# Altium PCB POD-Design-v1.1.PcbDoc (part 3 of 7)
Units mil, origin at the board's own origin, x right, y up, seen from the top; angles counter-clockwise.
Board outline 5511.81 x 3937.01 mil, 4 copper layers (Top Layer, Layer 1, Layer 2, Bottom Layer), stack 61.653 mil thick; 308 components, 227 nets, 905 pads, 367 vias.
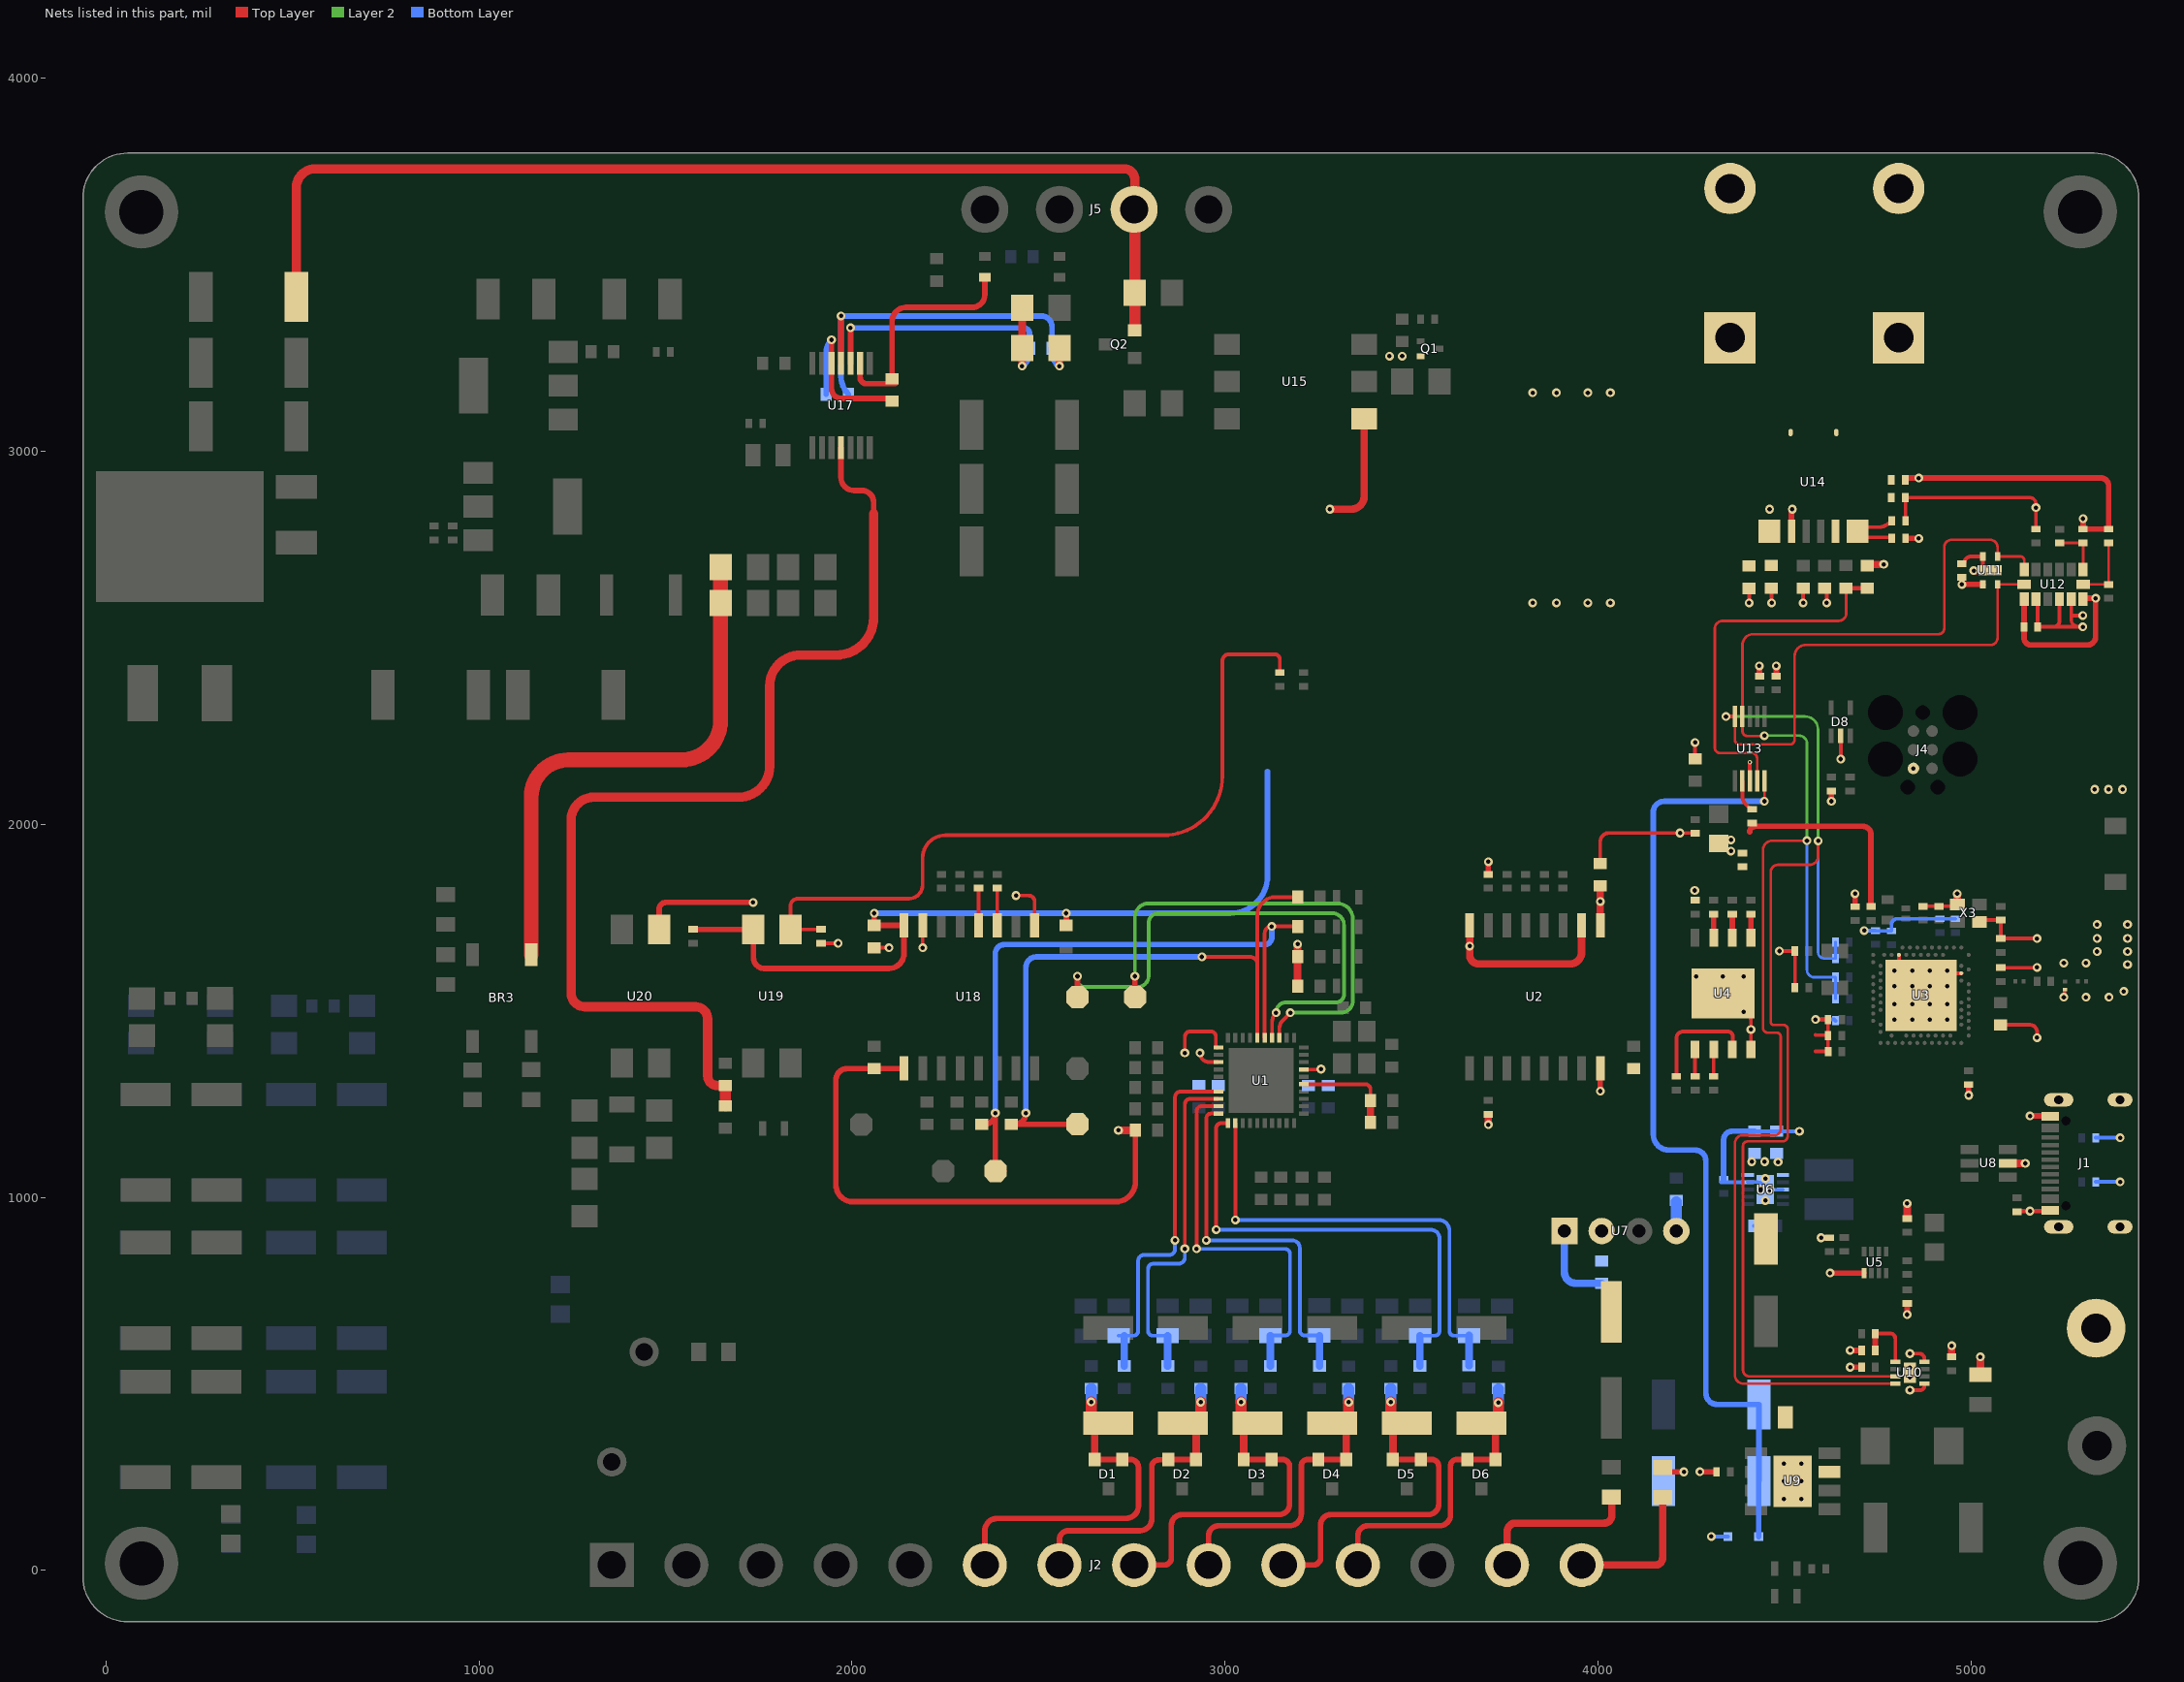
[diagram p4: the nets of this part, all layers, seen from the top]

## Part data (continued)
D7: "DIODE ZENER 3.3V 200MW SOD323F", Forward Voltage=1V, LCSC Part Number=C2978865, Manufacturer="ON Semiconductor / Fairchild", Max Operating Temperature=150°C, Max Power Dissipation=200mW, Max Reverse Leakage Current=4.5uA, Min Operating Temperature=-65°C, Package Quantity=1, Supplier Part Number 1=MM3Z3V3BCT-ND, Test Current=5mA, Tolerance=2%, Working Voltage=3.3V, ComponentLink1Description=http://www.onsemi.com/pub/Collateral/MM3Z9V1B-D.pdf?src-supplier=Digi-Key, ComponentLink1URL=http://www.onsemi.com/pub/Collateral/MM3Z9V1B-D.pdf?src-supplier=Digi-Key, ComponentLink2Description=http://www.mouser.com/ds/2/149/MM3Z3V3B-187166.pdf?src-supplier=Mouser, ComponentLink2URL=http://www.mouser.com/ds/2/149/MM3Z3V3B-187166.pdf?src-supplier=Mouser, ComponentLink3Description=https://www.fairchildsemi.com/datasheets/MM/MM3Z9V1B.pdf?src-supplier=Avnet, ComponentLink3URL=https://www.fairchildsemi.com/datasheets/MM/MM3Z9V1B.pdf?src-supplier=Avnet, ComponentLink4Description=http://www.farnell.com/datasheets/1706525.pdf?src-supplier=Element14, ComponentLink4URL=http://www.farnell.com/datasheets/1706525.pdf?src-supplier=Element14, Element Configuration=Single, Height=1mm, Impedance=89R, Item Type=Diode, Lead Free="Lead Free", Length=1.3mm, Manufacturer Part Number=MM3Z3V3B, Mount="Surface Mount", Number of Pins=2, Packaging="Tape and Reel", Peak Reverse Current=4.5uA, Power Dissipation=200mW, Pricing 1="1=0.22, 10=0.18, 100=0.0956, 500=0.06288, 1000=0.04276 (USD)", Radiation Hardening=No, REACH SVHC="No SVHC", Stock 1=473644, Supplier 1=Digi-Key, Voltage Tolerance=2%, Weight=0.0276g, Width=1.7mm, Zener Voltage=3.3V
D8: "TVS DIODE 3VWM SOT323-5", LCSC Part Number=C703691, Manufacturer=STMicroelectronics, ComponentLink1Description=https://datasheet.ciiva.com/23847/cd00002946-23847220.pdf?src-supplier=Newark, ComponentLink1URL=https://datasheet.ciiva.com/23847/cd00002946-23847220.pdf?src-supplier=Newark, ComponentLink2Description=https://datasheet.ciiva.com/4509/cd00002946-81943-4509940.pdf?src-supplier=Mouser, ComponentLink2URL=https://datasheet.ciiva.com/4509/cd00002946-81943-4509940.pdf?src-supplier=Mouser, ComponentLink3Description=https://datasheet.ciiva.com/5782/cd00002946-5782886.pdf?src-supplier=Farnell, ComponentLink3URL=https://datasheet.ciiva.com/5782/cd00002946-5782886.pdf?src-supplier=Farnell, ComponentLink4Description=https://datasheet.ciiva.com/338/cd00002946-338376.pdf?src-supplier=Digikey, ComponentLink4URL=https://datasheet.ciiva.com/338/cd00002946-338376.pdf?src-supplier=Digikey, ComponentLink5Description=https://datasheet.ciiva.com/338/cd00002946-338377.pdf?src-supplier=Digikey, ComponentLink5URL=https://datasheet.ciiva.com/338/cd00002946-338377.pdf?src-supplier=Digikey, ComponentLink6Description=https://datasheet.ciiva.com/338/cd00002946-338378.pdf?src-supplier=Digikey, ComponentLink6URL=https://datasheet.ciiva.com/338/cd00002946-338378.pdf?src-supplier=Digikey, Item Type="TVS Diodes", Manufacturer Part Number=ESDALC6V1W5, Pricing="3000=0.0569, 9000=0.0547, 12000=0.0774, 15000=0.0538, 30000=0.0749, 45000=0.0518, 75000=0.05 (USD)", RoHS=Yes, Stock=3000, Supplier="Future Electronics"
D11 D16 D17 D18: "DIODE AVAL 600V 1.5A DO214AC", LCSC Part Number=C241925, Manufacturer="Vishay Semiconductors", ComponentLink1Description=https://datasheet.ciiva.com/23642/1748785-23642024.pdf?src-supplier=Newark, ComponentLink1URL=https://datasheet.ciiva.com/23642/1748785-23642024.pdf?src-supplier=Newark, ComponentLink2Description=https://datasheet.ciiva.com/4452/byg20d-205199-4452450.pdf?src-supplier=Mouser, ComponentLink2URL=https://datasheet.ciiva.com/4452/byg20d-205199-4452450.pdf?src-supplier=Mouser, ComponentLink3Description=https://datasheet.ciiva.com/5779/1795675-5779021.pdf?src-supplier=Farnell, ComponentLink3URL=https://datasheet.ciiva.com/5779/1795675-5779021.pdf?src-supplier=Farnell, ComponentLink4Description=https://datasheet.ciiva.com/1178/57063-1178161.pdf?src-supplier=Element14, ComponentLink4URL=https://datasheet.ciiva.com/1178/57063-1178161.pdf?src-supplier=Element14, ComponentLink5Description=https://datasheet.ciiva.com/1178/57063-1178162.pdf?src-supplier=Element14, ComponentLink5URL=https://datasheet.ciiva.com/1178/57063-1178162.pdf?src-supplier=Element14, Item Type=Diodes, Manufacturer Part Number=BYG20J-E3/TR, Pricing="1=0.34, 10=0.207, 50=0.207, 100=0.145, 1000=0.096, 10000=0.088 (USD)", RoHS=Yes, Stock=105610, Supplier=Mouser
D19: "Independent Type 2.5V~2.9V 500mW 2.7V LL-34 Zener Diodes ROHS", LCSC Part Number=C2891738, Manufacturer="HXY MOSFET", Package=LL-34, ComponentLink1Description=LCSC, ComponentLink1URL=https://www.lcsc.com/product-detail/Zener-Diodes_YONGYUTAI-ZMM2V7_C2891738.html, Item Type=Diode, Manufacturer Part Number=ZMM2V7
FB1 FB2 FB3 FB4: "FERRITE BEAD 1.5 KOHM 0805 1LN", Frequency=100MHz, LCSC Part Number=C413959, Manufacturer=Murata, RMS Current (Irms)=250mA, ComponentLink1Description=https://datasheet.ciiva.com/19454/1845267-19454720.pdf?src-supplier=Jameco, ComponentLink1URL=https://datasheet.ciiva.com/19454/1845267-19454720.pdf?src-supplier=Jameco, ComponentLink2Description=https://datasheet.ciiva.com/14122/amblm21b-data-e-14122891.pdf?src-supplier=Distrelec, ComponentLink2URL=https://datasheet.ciiva.com/14122/amblm21b-data-e-14122891.pdf?src-supplier=Distrelec, ComponentLink3Description=https://datasheet.ciiva.com/6211/l0110s0100blm21b-6211484.pdf?src-supplier=Digikey, ComponentLink3URL=https://datasheet.ciiva.com/6211/l0110s0100blm21b-6211484.pdf?src-supplier=Digikey, ComponentLink4Description=https://datasheet.ciiva.com/6211/l0110s0100blm21b-6211486.pdf?src-supplier=Digikey, ComponentLink4URL=https://datasheet.ciiva.com/6211/l0110s0100blm21b-6211486.pdf?src-supplier=Digikey, ComponentLink5Description=https://datasheet.ciiva.com/6211/l0110s0100blm21b-6211487.pdf?src-supplier=Digikey, ComponentLink5URL=https://datasheet.ciiva.com/6211/l0110s0100blm21b-6211487.pdf?src-supplier=Digikey, ComponentLink6Description=https://datasheet.ciiva.com/16420/l0110s0100blm21b-16420715.pdf?src-supplier=Future+Electronics, ComponentLink6URL=https://datasheet.ciiva.com/16420/l0110s0100blm21b-16420715.pdf?src-supplier=Future+Electronics, ComponentLink7Description=https://datasheet.ciiva.com/17277/l0110s0100blm21b-17277370.pdf?, ComponentLink7URL=https://datasheet.ciiva.com/17277/l0110s0100blm21b-17277370.pdf?, ESR=450mR, Item Type="Ferrite Beads", Lead Free=5697LeadFree, Manufacturer Part Number=BLM21BD152SN1D, Number of Circuits=1NUMBER, Pricing="1=0.21, 10=0.114, 50=0.114, 100=0.102, 1000=0.068, 10000=0.048 (USD)", RoHS=Yes, Shielding=202Shielding, Stock=31999, Supplier=Mouser
FB5: "FERRITE BEAD 220 OHM 0805 1LN", Case Code (Imperial)=0805, Case Code (Metric)=2012, Current=2A, DC Resistance (DCR)=45mR, LCSC Part Number=C85840, Manufacturer=Murata, Max Operating Temperature=125°C, Min Operating Temperature=-55°C, Package Quantity=1, Test Frequency=100MHz, Tolerance=25%, Case/Package=0805, ComponentLink1Description=https://datasheet.ciiva.com/30514/1845321-30514028.pdf?src-supplier=Jameco, ComponentLink1URL=https://datasheet.ciiva.com/30514/1845321-30514028.pdf?src-supplier=Jameco, ComponentLink2Description=https://datasheet.ciiva.com/1012/l0110s0100blm21p-1012288.pdf?src-supplier=Digikey, ComponentLink2URL=https://datasheet.ciiva.com/1012/l0110s0100blm21p-1012288.pdf?src-supplier=Digikey, ComponentLink3Description=https://datasheet.ciiva.com/11799/0900766b81275e31-11799232.pdf?src-supplier=Rs, ComponentLink3URL=https://datasheet.ciiva.com/11799/0900766b81275e31-11799232.pdf?src-supplier=Rs, ComponentLink4Description=https://datasheet.ciiva.com/29348/442529-da-01-en-chip-drossel-0805-220r-2000ma-2-0x1-25mm-29348007.pdf?src-supplier=Conrad, ComponentLink4URL=https://datasheet.ciiva.com/29348/442529-da-01-en-chip-drossel-0805-220r-2000ma-2-0x1-25mm-29348007.pdf?src-supplier=Conrad, ComponentLink5Description=https://datasheet.ciiva.com/8021/1756152-8021596.pdf?src-supplier=Element14, ComponentLink5URL=https://datasheet.ciiva.com/8021/1756152-8021596.pdf?src-supplier=Element14, ComponentLink6Description=https://datasheet.ciiva.com/8021/1756152-8021598.pdf?src-supplier=Element14, ComponentLink6URL=https://datasheet.ciiva.com/8021/1756152-8021598.pdf?src-supplier=Element14, ComponentLink7Description=https://datasheet.ciiva.com/14122/anblm21p-data-e-14122214.pdf?src-supplier=Distrelec, ComponentLink7URL=https://datasheet.ciiva.com/14122/anblm21p-data-e-14122214.pdf?src-supplier=Distrelec, ComponentLink8Description=https://datasheet.ciiva.com/1012/l0110s0100blm21p-1012287.pdf?src-supplier=Digikey, ComponentLink8URL=https://datasheet.ciiva.com/1012/l0110s0100blm21p-1012287.pdf?src-supplier=Digikey, ComponentLink9Description=https://datasheet.ciiva.com/1012/l0110s0100blm21p-1012289.pdf?src-supplier=Digikey, ComponentLink9URL=https://datasheet.ciiva.com/1012/l0110s0100blm21p-1012289.pdf?src-supplier=Digikey, ComponentLink10Description=https://datasheet.ciiva.com/3081/l0110s0100blm21p-3081655.pdf?src-supplier=Avnet, ComponentLink10URL=https://datasheet.ciiva.com/3081/l0110s0100blm21p-3081655.pdf?src-supplier=Avnet, ComponentLink11Description=https://datasheet.ciiva.com/16215/l0110s0100blm21p-16215194.pdf?src-supplier=Future+Electronics, ComponentLink11URL=https://datasheet.ciiva.com/16215/l0110s0100blm21p-16215194.pdf?src-supplier=Future+Electronics, Core Material=Ferrite, Current Rating=2A, DC Current=2A, DC Resistance-Max=45mR, Depth=1.25mm, Height=0.85mm, Impedance=220R, Item Type="Ferrite Beads", Lead Free="Lead Free", Length=2mm, Manufacturer Part Number=BLM21PG221SN1D, Material=Steel,Ferrite, Max Current Rating=2A, Max DC Current=2A, Military Standard=Not, Number of Lines=1, Packaging="Tape and Reel", Pins=2, Pricing="4000=0.0243, 12000=0.0237, 20000=0.0234, 40000=0.0231, 80000=0.0225 (USD)", Radiation Hardening=No, Reach SVHC Compliant=No, RoHS=Yes, RoHS Compliant=Yes, Series=BLM21P, Stock=612000, Supplier="Future Electronics", Termination=SMD/SMT, Width=1.25mm
FB6: "FERRITE BEAD 1K OHM 0805 1LN", Case Code (Imperial)=0805, Case Code (Metric)=2012, DC Resistance (DCR)=300mR, LCSC Part Number=C307765, Manufacturer=TDK, Max Current Rating=500mA, Max Operating Temperature=125°C, Min Operating Temperature=-55°C, Package Quantity=4000, Ratings=AEC-Q200, Supplier Part Number 1=445-MMZ2012R102ATD25CT-ND, Test Frequency=100MHz, Tolerance=25%, Case/Package=0805, Category="Ferrite Beads and Chips", ComponentLink1Description=http://www.mouser.com/ds/2/400/beads_automotive_signal_mmz_en-469244.pdf?src-supplier=Mouser, ComponentLink1URL=http://www.mouser.com/ds/2/400/beads_automotive_signal_mmz_en-469244.pdf?src-supplier=Mouser, ComponentLink2Description=https://product.tdk.com/info/en/catalog/datasheets/beads_automotive_signal_mmz2012_en.pdf?src-supplier=Digi-Key, ComponentLink2URL=https://product.tdk.com/info/en/catalog/datasheets/beads_automotive_signal_mmz2012_en.pdf?src-supplier=Digi-Key, Height=0.041inch, Impedance=1kR, Item Type="Ferrite Bead", Length=0.079inch, Manufacturer Part Number=MMZ2012R102ATD25, Max DC Current=500mA, Mount="Surface Mount", Number of Lines=1, Packaging="Tape and Reel", Pricing 1="1=0.11000, 10=0.09200, 25=0.08280, 50=0.06080, 100=0.05240, 250=0.04140, 500=0.03496, 1000=0.02944 (USD)", RoHS=Yes, RoHS Compliant=Yes, Stock 1=2942, Supplier 1=Digi-Key, Termination=SMD/SMT, Weight=0.000194oz, Width=0.049inch
FB7 FB8: "FERRITE BEAD 1 KOHM 0603 1LN", Case Code (Imperial)=0603, Case Code (Metric)=1608, Clock Frequency=1GHz, Current Rating=500mA, DC Current=600mA, DC Resistance (DCR)=350mΩ, LCSC Part Number=C85828, Manufacturer=Murata, Max Operating Temperature=125°C, Min Operating Temperature=-55°C, Test Frequency=100MHz, Tolerance=25%, Case/Package=0603, ComponentLink1Description=https://datasheet.octopart.com:443/BLM18HE102SN1D-Murata-datasheet-180806799.pdf?src-supplier=IHS, ComponentLink1URL=https://datasheet.octopart.com:443/BLM18HE102SN1D-Murata-datasheet-180806799.pdf?src-supplier=IHS, ComponentLink2Description=https://datasheet.octopart.com:443/BLM18HE102SN1D-Murata-datasheet-11605494.pdf?src-supplier=Newark, ComponentLink2URL=https://datasheet.octopart.com:443/BLM18HE102SN1D-Murata-datasheet-11605494.pdf?src-supplier=Newark, ComponentLink3Description=https://datasheet.octopart.com:443/BLM18HE102SN1D-Murata-datasheet-8327473.pdf?src-supplier=Future+Electronics, ComponentLink3URL=https://datasheet.octopart.com:443/BLM18HE102SN1D-Murata-datasheet-8327473.pdf?src-supplier=Future+Electronics, ComponentLink4Description=https://datasheet.octopart.com:443/BLM18HE102SN1D-Murata-datasheet-153760.pdf?src-supplier=Future+Electronics, ComponentLink4URL=https://datasheet.octopart.com:443/BLM18HE102SN1D-Murata-datasheet-153760.pdf?src-supplier=Future+Electronics, ComponentLink5Description=https://datasheet.octopart.com:443/BLM18HE102SN1D-Murata-datasheet-62086320.pdf?src-supplier=Future+Electronics, ComponentLink5URL=https://datasheet.octopart.com:443/BLM18HE102SN1D-Murata-datasheet-62086320.pdf?src-supplier=Future+Electronics, ComponentLink6Description=https://datasheet.octopart.com:443/BLM18HE102SN1D-Murata-datasheet-141257957.pdf?src-supplier=Ciiva, ComponentLink6URL=https://datasheet.octopart.com:443/BLM18HE102SN1D-Murata-datasheet-141257957.pdf?src-supplier=Ciiva, ComponentLink7Description=https://datasheet.octopart.com:443/BLM18HE102SN1D-Murata-datasheet-138707045.pdf?src-supplier=Ciiva, ComponentLink7URL=https://datasheet.octopart.com:443/BLM18HE102SN1D-Murata-datasheet-138707045.pdf?src-supplier=Ciiva, ComponentLink8Description=https://datasheet.octopart.com:443/BLM18HE102SN1D-Murata-datasheet-155421615.pdf?src-supplier=TME, ComponentLink8URL=https://datasheet.octopart.com:443/BLM18HE102SN1D-Murata-datasheet-155421615.pdf?src-supplier=TME, ComponentLink9Description=https://datasheet.octopart.com:443/BLM18HE102SN1D-Murata-datasheet-62117744.pdf?src-supplier=TME, ComponentLink9URL=https://datasheet.octopart.com:443/BLM18HE102SN1D-Murata-datasheet-62117744.pdf?src-supplier=TME, ComponentLink10Description=https://datasheet.octopart.com/BLM18HE102SN1D-Murata-datasheet-37129980.pdf, ComponentLink10URL=https://datasheet.octopart.com/BLM18HE102SN1D-Murata-datasheet-37129980.pdf, ComponentLink11Description=http://sigma.octopart.com:80/reach_statement/Murata-company-16.pdf?src-supplier=Compliance+Statements, ComponentLink11URL=http://sigma.octopart.com:80/reach_statement/Murata-company-16.pdf?src-supplier=Compliance+Statements, Contact Plating=Tin, Core Material=Ferrite, Depth=800µm, ESR=350mΩ, Height=800µm, Impedance=1kΩ, Item Type="Ferrite Beads", Lead Free="Lead Free", Length=1.6mm, Lifecycle Status=Production, Manufacturer Part Number=BLM18HE102SN1D, Material="Ferrite, Steel", Max Current Rating=600mA, Max DC Current=600mA, Military Standard=Not, Number of Circuits=1, Number of Lines=1, Number of Terminals=2, Packaging=Digi-Reel®, Pins=2, Pricing="4000=0.0464 (USD)", Radiation Hardening=No, REACH SVHC=Yes, RMS Current (Irms)=600mA, RoHS=Compliant, Schedule B="8504500000, 8504500000|8504500000|8504500000|8504500000|8504500000|8504500000|8504500000|8504500000|8504500000|8504500000|8504500000|8504500000|8504500000|8504500000|8504500000|8504500000|8504500000|8504500000|8504500000|8504500000|8504500000|8504500000|8504500000|85", Stock=112000, Supplier="Arrow Electronics", Termination=SMD/SMT, Width=800µm
J1: "5A 1 16P Female Type-C SMD USB Connectors ROHS", LCSC Part Number=C165948, Manufacturer="Korean Hroparts Elec", ComponentLink1Description=LCSC, ComponentLink1URL=https://www.lcsc.com/product-detail/USB-Connectors_Korean-Hroparts-Elec-TYPE-C-31-M-12_C165948.html, Item Type="USB Connector", Manufacturer Part Number=TYPE-C-31-M-12
J2: "320V 20A 14 Bend -40℃~+105℃ 1 5.08mm 1x14P Green Receptacle-Close Screw Fixing Push-Pull,P=5.08mm Pluggable System Terminal Block ROHS", LCSC Part Number=C430534, Manufacturer=DORABO, Package=Push-Pull,P=5.08mm, ComponentLink1Description=LCSC, ComponentLink1URL=https://www.lcsc.com/product-detail/Pluggable-System-Terminal-Block_DORABO-DB2ERM-5-08-14P-GN_C430534.html?s_z=n_DB2ERM-5.08-14P-GN, Item Type="Terminal Block", Manufacturer Part Number=DB2ERM-5.08-14P-GN
J4: "CABLE ADAPTER 6 POS", Manufacturer=Tag-Connect, Package Quantity=1, Supplier Part Number 1=TC2030-IDC-ND, ComponentLink1Description=http://www.tag-connect.com/Materials/TC2030-MCP%20Datasheet.pdf?src-supplier=Digi-Key, ComponentLink1URL=http://www.tag-connect.com/Materials/TC2030-MCP%20Datasheet.pdf?src-supplier=Digi-Key, Manufacturer Part Number=TC2030-IDC, Pricing 1="1=43.71 (USD)", Stock 1=284, Supplier 1=Digi-Key
J5: "320V 20A 4 Bend -40℃~+105℃ 1 5.08mm 1x4P Green Receptacle-Close Screw Fixing Push-Pull,P=5.08mm Pluggable System Terminal Block ROHS", LCSC Part Number=C395755, Manufacturer=DORABO, Package=Push-Pull,P=5.08mm, ComponentLink1Description=LCSC, ComponentLink1URL=https://www.lcsc.com/product-detail/Pluggable-System-Terminal-Block_DORABO-DB2ERM-5-08-4P-GN_C395755.html?s_z=n_DB2ERM-5.08-4P-GN, Item Type="Terminal Block", Manufacturer Part Number=DB2ERM-5.08-4P-GN
J7: "1000V 57A 1 1 10.16mm P=10.16mm Pluggable System Terminal Block ROHS", LCSC Part Number=C5445315, Manufacturer=DORABO, Package=P=10.16mm, ComponentLink1Description=LCSC, ComponentLink1URL=https://www.lcsc.com/product-detail/Pluggable-System-Terminal-Block_DORABO-DB136H-10-16-1P-RD-P_C5445315.html, Item Type="Terminal Block", Manufacturer Part Number=DB136H-10.16-1P-RD-P
J8: "1000V 57A 1 1 10.16mm P=10.16mm Pluggable System Terminal Block ROHS", LCSC Part Number=C5445314, Manufacturer=DORABO, Package=P=10.16mm, ComponentLink1Description=LCSC, ComponentLink1URL=https://www.lcsc.com/product-detail/Pluggable-System-Terminal-Block_DORABO-DB136H-10-16-1P-BK-P_C5445314.html, Item Type="Terminal Block", Manufacturer Part Number=DB136H-10.16-1P-BK-P
L1: library part LQG15HN15NJ02D, "FIXED IND 15NH 400MA 0.45OHM SMD", Case Code (Imperial)=0402, Case Code (Metric)=1005, Current Rating=300mA, DC Resistance (DCR)=460mR, Inductance Tolerance=5%, LCSC Part Number=C97979, Manufacturer=Murata, Max Operating Temperature=125°C, Min Operating Temperature=-55°C, Package Quantity=1, Self Resonant Frequency=2.3GHz, Test Frequency=100MHz, Case/Package=0402, ComponentLink1Description=https://datasheet.ciiva.com/11801/0900766b80f10808-11801397.pdf?src-supplier=Rs, ComponentLink1URL=https://datasheet.ciiva.com/11801/0900766b80f10808-11801397.pdf?src-supplier=Rs, ComponentLink2Description=https://datasheet.ciiva.com/8002/66026-8002488.pdf?src-supplier=Element14, ComponentLink2URL=https://datasheet.ciiva.com/8002/66026-8002488.pdf?src-supplier=Element14, ComponentLink3Description=https://datasheet.ciiva.com/29696/l0075s0083lqg15hn-29696702.pdf?src-supplier=Digikey, ComponentLink3URL=https://datasheet.ciiva.com/29696/l0075s0083lqg15hn-29696702.pdf?src-supplier=Digikey, ComponentLink4Description=https://datasheet.ciiva.com/1063/l0075s0083lqg15hn-1063850.pdf?src-supplier=Digikey, ComponentLink4URL=https://datasheet.ciiva.com/1063/l0075s0083lqg15hn-1063850.pdf?src-supplier=Digikey, ComponentLink5Description=https://datasheet.ciiva.com/29696/l0075s0083lqg15hn-29696703.pdf?src-supplier=Digikey, ComponentLink5URL=https://datasheet.ciiva.com/29696/l0075s0083lqg15hn-29696703.pdf?src-supplier=Digikey, Core Material=Air, DC Current=300mA, Depth=0.55mm, ESR=450mR, Height=0.5mm, Height - Seated (Max)=0.022inch, Item Type=Inductor, Length=0.039inch, Manufacturer Part Number=LQG15HN15NJ02D, Max Current Rating=300mA, Max DC Current=300mA, Military Standard=Not, Mounting Technology="Surface Mount", Packaging="Tape and Reel", Pricing="1=0.1, 10=0.037, 50=0.037, 100=0.029, 1000=0.022, 10000=0.018 (USD)", Q Factor=8, Reach SVHC Compliant=No, RoHS=Yes, RoHS Compliant=Yes, Series=LQG15HS, Shielding=Unshielded, Stock=45308, Supplier=Mouser, Termination=SMD/SMT, Tolerance=5%, Width=0.02inch
L2: library part MLZ1608M100WT000, "FIXED IND 10UH 250MA 1.05OHM SMD", Case Code (Imperial)=0603, Case Code (Metric)=1608, Current Rating=250mA, DC Resistance (DCR)=1.365R, LCSC Part Number=C76798, Manufacturer=TDK, Max Operating Temperature=125°C, Min Operating Temperature=-55°C, Package Quantity=4000, Saturation Current=90mA, Self Resonant Frequency=50MHz, Test Frequency=2MHz, Tolerance=20%, Case/Package=0603, ComponentLink1Description=https://product.tdk.com/info/en/catalog/datasheets/inductor_commercial_decoupling_mlz1608_en.pdf?src-supplier=Digikey, ComponentLink1URL=https://product.tdk.com/info/en/catalog/datasheets/inductor_commercial_decoupling_mlz1608_en.pdf?src-supplier=Digikey, ComponentLink2Description=https://datasheet.octopart.com/MLZ1608M100WT000-TDK-datasheet-12356712.pdf?src-supplier=Newark, ComponentLink2URL=https://datasheet.octopart.com/MLZ1608M100WT000-TDK-datasheet-12356712.pdf?src-supplier=Newark, ComponentLink3Description=https://datasheet.octopart.com/MLZ1608M100WT000-TDK-datasheet-38159369.pdf?src-supplier=Future+Electronics, ComponentLink3URL=https://datasheet.octopart.com/MLZ1608M100WT000-TDK-datasheet-38159369.pdf?src-supplier=Future+Electronics, Core Material=Ferrite, ESR=1.05R, Height=950um, Height - Seated (Max)=0.037inch, Item Type=Inductors, Length=0.063inch, Manufacturer Part Number=MLZ1608M100WT000, Mounting Technology="Surface Mount", Packaging="Cut Tape", Pricing="1=0.14, 10=0.09, 25=0.0804, 50=0.0706, 100=0.0617, 250=0.05292 (USD)", RMS Current (Irms)=250mA, RoHS=Yes, RoHS Compliant=Yes, Series=MLZ, Shielding=Shielded, Stock=146199, Supplier=Digikey, Width=0.031inch
L3 L4: library part LQP03TG3N9B02D, "FIXED IND 3.9NH 350MA 350MOHM SM", Case/Package=0201, Current Rating=350mA, DC Resistance (DCR)=350mR, LCSC Part Number=C86114, Manufacturer=Murata, Max Operating Temperature=125°C, Min Operating Temperature=-55°C, Package Quantity=15000, Self Resonant Frequency=6GHz, Test Frequency=500MHz, ComponentLink1Description=https://datasheet.ciiva.com/29691/jelf243c-0016-29691349.pdf?src-supplier=Digikey, ComponentLink1URL=https://datasheet.ciiva.com/29691/jelf243c-0016-29691349.pdf?src-supplier=Digikey, DC Current=350mA, Depth=0.33mm, Height=0.3mm, Height - Seated (Max)=0.013inch, Item Type=Inductors, Length=0.024inch, Manufacturer Part Number=LQP03TG3N9B02D, Max DC Current=350mA, Military Standard=Not, Mounting Technology="Surface Mount", Packaging="Tape and Reel", Pricing="1=0.1, 10=0.025, 25=0.0224, 50=0.0208, 100=0.0193, 250=0.01748, 500=0.0162, 1000=0.01502, 2500=0.01358 (USD)", RoHS=Yes, RoHS Compliant=Yes, Series=LQP03TG_02, Shielding=Unshielded, Stock=170, Supplier=Digikey, Technology="THIN FILM", Width=0.012inch
L5: library part LQP03TN2N7B02D, "FIXED IND 2.7NH 500MA 200MOHM SM", Case Code (Imperial)=0201, Case Code (Metric)=0603, Current=350mA, Current Rating=500mA, DC Resistance (DCR)=200mR, Inductance=2.7nH, LCSC Part Number=C98043, Manufacturer=Murata, Max Operating Temperature=125°C, Min Operating Temperature=-55°C, Package Quantity=1, Self Resonant Frequency=6GHz, Supplier Part Number 1=1065349, Test Frequency=500MHz, Tolerance=3%, Case/Package=0201, Category="Fixed Inductors", ComponentLink1Description=http://www.farnell.com/datasheets/1888743.pdf?src-supplier=Farnell, ComponentLink1URL=http://www.farnell.com/datasheets/1888743.pdf?src-supplier=Farnell, ComponentLink2Description=http://www.mouser.com/ds/2/281/c51e-794816.pdf?src-supplier=Mouser, ComponentLink2URL=http://www.mouser.com/ds/2/281/c51e-794816.pdf?src-supplier=Mouser, ComponentLink3Description=https://media.digikey.com/pdf/Data%20Sheets/Murata%20PDFs/LQP03_Series_Br.pdf?src-supplier=Digi-Key, ComponentLink3URL=https://media.digikey.com/pdf/Data%20Sheets/Murata%20PDFs/LQP03_Series_Br.pdf?src-supplier=Digi-Key, ComponentLink4Description=http://components.arrow.com/part/dataview/49670632S8721729N2606?src-supplier=Arrow+Electronics, ComponentLink4URL=http://components.arrow.com/part/dataview/49670632S8721729N2606?src-supplier=Arrow+Electronics, ComponentLink5Description=https://datasheet.octopart.com/LQP03TN2N7B02D-Murata-datasheet-26765549.pdf?src-supplier=Future+Electronics, ComponentLink5URL=https://datasheet.octopart.com/LQP03TN2N7B02D-Murata-datasheet-26765549.pdf?src-supplier=Future+Electronics, ComponentLink6Description=http://psearch.en.murata.com/inductor/product/LQP03TN2N7B02%23.pdf?src-supplier=Avnet, ComponentLink6URL=http://psearch.en.murata.com/inductor/product/LQP03TN2N7B02%23.pdf?src-supplier=Avnet, ComponentLink7Description=http://search.murata.co.jp/Ceramy/image/img/w_hinm/S0084E.pdf?src-supplier=Digi-Key, ComponentLink7URL=http://search.murata.co.jp/Ceramy/image/img/w_hinm/S0084E.pdf?src-supplier=Digi-Key, ComponentLink8Description=http://www.farnell.com/datasheets/1888743.pdf?src-supplier=Newark, ComponentLink8URL=http://www.farnell.com/datasheets/1888743.pdf?src-supplier=Newark, ComponentLink9Description=http://www.farnell.com/datasheets/1888743.pdf?src-supplier=Element14, ComponentLink9URL=http://www.farnell.com/datasheets/1888743.pdf?src-supplier=Element14, ComponentLink10Description=https://datasheet.octopart.com/LQP03TN2N7B02D-Murata-datasheet-141404629.pdf?src-supplier=TME, ComponentLink10URL=https://datasheet.octopart.com/LQP03TN2N7B02D-Murata-datasheet-141404629.pdf?src-supplier=TME, Core Material=Non-Magnetic, DC Current=500mA, Depth=0.33mm, Height=0.3mm, Height - Seated (Max)=0.013inch, Item Type=Inductor, Lead Free="Lead Free", Length=0.024inch, Manufacturer Part Number=LQP03TN2N7B02D, Max DC Current=500mA, Military Standard=Not, Mount="Surface Mount", Packaging="Tape and Reel", Pricing 1="200=0.007 (GBP)", Q Factor=14, Reach SVHC Compliant=No, RoHS=Yes, RoHS Compliant=Yes, Series=LQP03TN_02, Shielding=Unshielded, Stock 1=4000, Supplier 1=Rs, Technology="THIN FILM", Termination=SMD/SMT, Width=0.012inch
L6: library part LVT303012-1R5M-N, "2.34A 1.5uH Shielded Power Inductors ±20% SMD Power Inductors ROHS", LCSC Part Number=C280560, Manufacturer="Chilisin Elec", Package=SMD, ComponentLink1Description=LCSC, ComponentLink1URL=https://www.lcsc.com/product-detail/Power-Inductors_Chilisin-Elec-LVT303012-1R5M-N_C280560.html, Item Type=Inductor, Manufacturer Part Number=LVT303012-1R5M-N
L7: library part YSPI0520-2R2M, "4A 2.2uH ±20% 32mΩ SMD,5.4x5.2x2mm Power Inductors ROHS", LCSC Part Number=C718375, Manufacturer=YJYCOIN, ComponentLink1Description=LCSC, ComponentLink1URL=https://www.lcsc.com/product-detail/Power-Inductors_YJYCOIN-YSPI0520-2R2M_C718375.html, Item Type=Inductor, Manufacturer Part Number=YSPI0520-2R2M
LED1 LED2 LED3 LED4 LED5: library part NCD0603G2, "Emerald 0603 Light Emitting Diodes (LED) ROHS", LCSC Part Number=C87326, Manufacturer="Foshan NationStar Optoelectronics", Package=0603, ComponentLink1Description=LCSC, ComponentLink1URL=https://www.lcsc.com/product-detail/Light-Emitting-Diodes-LED_Foshan-NationStar-Optoelectronics-NCD0603G2_C87326.html, Item Type=LED, Manufacturer Part Number=NCD0603G2
LED6 LED7: library part NCD0603R3, "RED LED 0603 Light Emitting Diodes", LCSC Part Number=C3151730, Manufacturer="Foshan NationStar Optoelectronics", Package=0603, ComponentLink1Description=LCSC, ComponentLink1URL=https://www.lcsc.com/product-detail/Light-Emitting-Diodes-LED_Foshan-NationStar-Optoelectronics-NCD0603R3_C3151730.html, Item Type=LED, Manufacturer Part Number=NCD0603R3
Q1: "TRANS NPN 40V 0.2A SOT523", LCSC Part Number=C239187, Manufacturer="Diodes Zetex", Supplier Part Number=4140292, Category=BJTs, ComponentLink1Description=https://datasheet.ciiva.com/15139/getdatasheetpartid-142850-15139485.pdf?src-supplier=Verical, ComponentLink1URL=https://datasheet.ciiva.com/15139/getdatasheetpartid-142850-15139485.pdf?src-supplier=Verical, ComponentLink2Description=https://datasheet.ciiva.com/11199/ds30270-11199009.pdf?src-supplier=Avnet, ComponentLink2URL=https://datasheet.ciiva.com/11199/ds30270-11199009.pdf?src-supplier=Avnet, ComponentLink3Description=https://datasheet.ciiva.com/17053/0900766b80e49818-17053736.pdf?src-supplier=Allied+Electronics, ComponentLink3URL=https://datasheet.ciiva.com/17053/0900766b80e49818-17053736.pdf?src-supplier=Allied+Electronics, ComponentLink4Description=https://datasheet.ciiva.com/8029/ds30270-8029717.pdf?src-supplier=Element14, ComponentLink4URL=https://datasheet.ciiva.com/8029/ds30270-8029717.pdf?src-supplier=Element14, ComponentLink5Description=https://datasheet.ciiva.com/22711/480146-22711751.pdf?src-supplier=Element14, ComponentLink5URL=https://datasheet.ciiva.com/22711/480146-22711751.pdf?src-supplier=Element14, ComponentLink6Description=https://datasheet.ciiva.com/4723/ds30270-4723401.pdf?src-supplier=Mouser, ComponentLink6URL=https://datasheet.ciiva.com/4723/ds30270-4723401.pdf?src-supplier=Mouser, ComponentLink7Description=https://datasheet.ciiva.com/6360/ds30270-6360919.pdf?src-supplier=Digikey, ComponentLink7URL=https://datasheet.ciiva.com/6360/ds30270-6360919.pdf?src-supplier=Digikey, Item Type=Transistor, Manufacturer Part Number=MMBT3904T-7-F, Pricing="3000=0.0261, 9000=0.0252, 15000=0.0248, 60000=0.0236, 90000=0.0229 (USD)", RoHS=Yes, Stock=36000, Supplier="Future Electronics"
Q2: "10mA 600V 1 TRIAC SOT-23-3L Thyristors (SCR)/Modules ROHS", LCSC Part Number=C2831928, Manufacturer=KY, Item Type=Triac, Manufacturer Part Number=MAC97A6-23-3L
Q5 Q8: "SCR 800V 1.25A SOT223", Case/Package=SOT-223, Current Rating=800mA, Hold Current=5mA, LCSC Part Number=C222164, Leakage Current=500µA, Manufacturer=STMicroelectronics, Max Operating Temperature=125°C, Max Repetitive Reverse Voltage (Vrrm)=800V, Min Operating Temperature=-40°C, RMS Current (Irms)=1.25A, China RoHS=Non-Compliant, ComponentLink1Description=https://datasheet.octopart.com:443/X0202NN-5BA4-STMicroelectronics-datasheet-10407941.pdf?src-supplier=element14+APAC, ComponentLink1URL=https://datasheet.octopart.com:443/X0202NN-5BA4-STMicroelectronics-datasheet-10407941.pdf?src-supplier=element14+APAC, ComponentLink2Description=https://datasheet.octopart.com:443/X0202NN-5BA4-STMicroelectronics-datasheet-21815840.pdf?src-supplier=element14+APAC, ComponentLink2URL=https://datasheet.octopart.com:443/X0202NN-5BA4-STMicroelectronics-datasheet-21815840.pdf?src-supplier=element14+APAC, ComponentLink3Description=https://datasheet.octopart.com:443/X0202NN-5BA4-STMicroelectronics-datasheet-22136608.pdf?src-supplier=STMicroelectronics, ComponentLink3URL=https://datasheet.octopart.com:443/X0202NN-5BA4-STMicroelectronics-datasheet-22136608.pdf?src-supplier=STMicroelectronics, ComponentLink4Description=https://datasheet.octopart.com:443/X0202NN-5BA4-STMicroelectronics-datasheet-8604.pdf?src-supplier=Farnell, ComponentLink4URL=https://datasheet.octopart.com:443/X0202NN-5BA4-STMicroelectronics-datasheet-8604.pdf?src-supplier=Farnell, Height=1.8mm, Item Type=SCRs, Lead Free="Lead Free", Length=6.7mm, Lifecycle Status=Production, Manufacturer Part Number="X0202NN 5BA4", Mounting Technology="Surface Mount", Number of Contacts=3, Number of Elements=1, Number of Terminals=4, Pins=3, Pricing="1000=0.1625, 2000=0.152, 3000=0.15, 5000=0.103, 7000=0.102, 10000=0.099, 25000=0.098 (USD)", Radiation Hardening=No, REACH SVHC=No, RoHS=Compliant, Schedule B="8541300080, 8541300080|8541300080|8541300080|8541300080|8541300080", Stock=26000, Supplier="Arrow Electronics", Termination=SMD/SMT, Voltage Rating (DC)=800V, Width=3.7mm
Q6: "TRANS NPN 400V 8A D2PAK", LCSC Part Number=C500928, Manufacturer=STMicroelectronics, ComponentLink1Description=https://datasheet.ciiva.com/22733/1689954-22733255.pdf?src-supplier=Element14, ComponentLink1URL=https://datasheet.ciiva.com/22733/1689954-22733255.pdf?src-supplier=Element14, ComponentLink2Description=https://datasheet.ciiva.com/977/cd00116674-977035.pdf?src-supplier=Digikey, ComponentLink2URL=https://datasheet.ciiva.com/977/cd00116674-977035.pdf?src-supplier=Digikey, ComponentLink3Description=https://datasheet.ciiva.com/977/cd00116674-977036.pdf?src-supplier=Digikey, ComponentLink3URL=https://datasheet.ciiva.com/977/cd00116674-977036.pdf?src-supplier=Digikey, ComponentLink4Description=https://datasheet.ciiva.com/977/cd00116674-977037.pdf?src-supplier=Digikey, ComponentLink4URL=https://datasheet.ciiva.com/977/cd00116674-977037.pdf?src-supplier=Digikey, ComponentLink5Description=https://datasheet.ciiva.com/11198/cd00116674-11198854.pdf?src-supplier=Avnet, ComponentLink5URL=https://datasheet.ciiva.com/11198/cd00116674-11198854.pdf?src-supplier=Avnet, ComponentLink6Description=https://datasheet.ciiva.com/16490/cd00116674-16490093.pdf?src-supplier=Future+Electronics, ComponentLink6URL=https://datasheet.ciiva.com/16490/cd00116674-16490093.pdf?src-supplier=Future+Electronics, ComponentLink7Description=https://datasheet.ciiva.com/4722/cd00116674-4722268.pdf?src-supplier=Mouser, ComponentLink7URL=https://datasheet.ciiva.com/4722/cd00116674-4722268.pdf?src-supplier=Mouser, Item Type=BJTs, Manufacturer Part Number=STB13007DT4, Pricing="1=1.5973, 10=1.0989, 25=1.0879, 100=0.7233, 250=0.7161, 500=0.6025, 1000=0.4613 (USD)", RoHS=Yes, Stock=1694, Supplier="Arrow Electronics"
R1 R5 R7 R8 R9 R13 R15 R19 R24 R25: library part RC0603FR-070RL, "RES SMD 0R, 1%, 0.1W, 0603", LCSC Part Number=C100044, Manufacturer=Yageo, Package=0603, ComponentLink9Description=LCSC, ComponentLink9URL=https://www.lcsc.com/product-detail/Chip-Resistor-Surface-Mount_YAGEO-RC0603FR-070RL_C100044.html, Item Type=Resistor, Manufacturer Part Number=RC0603FR-070RL
R2 R6 R10 R14 R16 R20: library part RC0603FR-071KL, "RES SMD 1K OHM 1% 1/10W 0603", Case Code (Imperial)=0603, Case Code (Metric)=1608, LCSC Part Number=C22548, Manufacturer=Yageo, Max Operating Temperature=155°C, Min Operating Temperature=-55°C, Power Rating=100mW, Resistance=1kR, Supplier Part Number 1=311-1.00KHRDKR-ND, Temperature Coefficient=100ppm/°C, Tolerance=1%, Voltage Rating=50V, Case/Package=0603, ComponentLink1Description=https://www.verical.com/server-webapp/html/getDatasheet?partID=409289&src-supplier=Verical, ComponentLink1URL=https://www.verical.com/server-webapp/html/getDatasheet?partID=409289&src-supplier=Verical, ComponentLink2Description=http://documents.rs-components.com/techlib://itc_doclist_GB.htm?stockno=5048928&src-supplier=RSComponents, ComponentLink2URL=http://documents.rs-components.com/techlib://itc_doclist_GB.htm?stockno=5048928&src-supplier=RSComponents, ComponentLink3Description=http://www.yageo.com/documents/recent/PYu-RC0603_51_RoHS_L_4.pdf?src-supplier=Avnet+Europe, ComponentLink3URL=http://www.yageo.com/documents/recent/PYu-RC0603_51_RoHS_L_4.pdf?src-supplier=Avnet+Europe, ComponentLink4Description=http://www.farnell.com/datasheets/2167052.pdf?src-supplier=Element14, ComponentLink4URL=http://www.farnell.com/datasheets/2167052.pdf?src-supplier=Element14, ComponentLink5Description=http://www.farnell.com/datasheets/1868787.pdf?src-supplier=Element14, ComponentLink5URL=http://www.farnell.com/datasheets/1868787.pdf?src-supplier=Element14, ComponentLink6Description=http://www.yageo.com/documents/recent/PYu-RC_Group_51_RoHS_L_2.pdf?src-supplier=Avnet, ComponentLink6URL=http://www.yageo.com/documents/recent/PYu-RC_Group_51_RoHS_L_2.pdf?src-supplier=Avnet, ComponentLink7Description=https://www.verical.com/server-webapp/html/getDatasheet?partID=404327&src-supplier=Verical, ComponentLink7URL=https://www.verical.com/server-webapp/html/getDatasheet?partID=404327&src-supplier=Verical, ComponentLink8Description=http://www.farnell.com/datasheets/443971.pdf?src-supplier=Element14, ComponentLink8URL=http://www.farnell.com/datasheets/443971.pdf?src-supplier=Element14, Composition="Thick Film", Contact Plating=Tin,Matte, Depth=0.8mm, Height=0.45mm, Item Type=Resistor, Lead Free="Lead Free", Length=1.6mm, Manufacturer Part Number=RC0603FR-071KL, Military Standard=Not, Packaging="Tape and Reel", Pricing 1="1=0.1, 10=0.023, 100=0.0094, 1000=0.0042, 2500=0.0037 (USD)", Radiation Hardening=No, REACH SVHC="No SVHC", Stock 1=21472395, Supplier 1=Digi-Key, Termination=SMD/SMT
R3 R4 R11 R12 R17 R18: library part PA2512FKE7T0R002E, "RES 0.002 OHM 1% 3W 2512", LCSC Part Number=C375692, Manufacturer=Yageo, Item Type=Resistors, Manufacturer Part Number=PA2512FKE7T0R002E, Pricing="1=0.87, 10=0.754, 25=0.662, 50=0.5936, 100=0.5253, 250=0.45696, 500=0.37944, 1000=0.31212 (USD)", RoHS=Yes, Stock=3531, Supplier=Digikey
R21 R22 R65 R66 R142 R143 R147: library part RC0402FR-074K7L, "RES 4.7K OHM 1% 1/16W 0402", Case Code (Imperial)=0402, Case Code (Metric)=1005, LCSC Part Number=C105871, Manufacturer=Yageo, Max Operating Temperature=155°C, Max Power Dissipation=63mW, Min Operating Temperature=-55°C, Power Rating=62.5mW, Resistance=4.7kR, Resistance Tolerance=1%, Resistor Type="Thick Film", Temperature Coefficient=100ppm/°C, Voltage Rating=50V, Case/Package=0402, Category="Chip SMD Resistors", ComponentLink1Description=https://datasheet.ciiva.com/22661/1686128-22661342.pdf?src-supplier=Element14, ComponentLink1URL=https://datasheet.ciiva.com/22661/1686128-22661342.pdf?src-supplier=Element14, ComponentLink2Description=https://datasheet.ciiva.com/7850/1018594-7850022.pdf?src-supplier=Element14, ComponentLink2URL=https://datasheet.ciiva.com/7850/1018594-7850022.pdf?src-supplier=Element14, ComponentLink3Description=https://datasheet.ciiva.com/7850/1018594-7850023.pdf?src-supplier=Element14, ComponentLink3URL=https://datasheet.ciiva.com/7850/1018594-7850023.pdf?src-supplier=Element14, ComponentLink4Description=https://datasheet.ciiva.com/15215/getdatasheetpartid-328119-15215035.pdf?src-supplier=Verical, ComponentLink4URL=https://datasheet.ciiva.com/15215/getdatasheetpartid-328119-15215035.pdf?src-supplier=Verical, Construction=Rectangular, Depth=0.5mm, Features="Moisture Resistant", Height=0.32mm, Height - Seated (Max)=0.016inch, Item Type=Resistor, Lead Free="Lead Free", Length=1mm, Manufacturer Part Number=RC0402FR-074K7L, Military Standard=Not, Number of Pins=2, Number of Terminations=2, Packaging="Tape and Reel", Pricing 1="10000=0.00085 (USD)", Reach SVHC Compliant=Yes, RoHS=Yes, RoHS Compliant=Yes, Series=RC, Size Code=0402, Stock 1=2420000, Supplier 1=Avnet, Supplier Part Number 1=RC0402FR-074K7L, Termination=SMD/SMT, Tolerance=1%, Voltage Rating (DC)=50V, Width=0.5mm
R23: library part RC0603FR-0710KL, "RES SMD 10K Ohm 1% 1/10W 0603", Case Code (Imperial)=0603, Case Code (Metric)=1608, LCSC Part Number=C98220, Manufacturer=Yageo, Max Operating Temperature=155°C, Max Power Dissipation=100mW, Min Operating Temperature=-55°C, Resistance=10kR, Resistance Tolerance=1%, Resistor Type="Thick Film", Supplier Part Number 1=311-10.0KHRCT-ND, Temperature Coefficient=100ppm/°C, Voltage Rating=75V, Voltage Rating (DC)=50V, Case/Package=0603, Category="Chip SMD Resistors", ComponentLink1Description=https://datasheet.ciiva.com/7660/38590-7660789.pdf?src-supplier=Element14, ComponentLink1URL=https://datasheet.ciiva.com/7660/38590-7660789.pdf?src-supplier=Element14, ComponentLink2Description=https://datasheet.ciiva.com/7983/443971-7983596.pdf?src-supplier=Element14, ComponentLink2URL=https://datasheet.ciiva.com/7983/443971-7983596.pdf?src-supplier=Element14, ComponentLink3Description=https://datasheet.ciiva.com/22747/443971-22747519.pdf?src-supplier=Element14, ComponentLink3URL=https://datasheet.ciiva.com/22747/443971-22747519.pdf?src-supplier=Element14, ComponentLink4Description=https://datasheet.ciiva.com/46440/1868787-46440891.pdf?src-supplier=Element14, ComponentLink4URL=https://datasheet.ciiva.com/46440/1868787-46440891.pdf?src-supplier=Element14, ComponentLink5Description=https://datasheet.ciiva.com/7746/1738695-7746239.pdf?src-supplier=Element14, ComponentLink5URL=https://datasheet.ciiva.com/7746/1738695-7746239.pdf?src-supplier=Element14, ComponentLink6Description=https://datasheet.ciiva.com/15189/getdatasheetpartid-409289-15189591.pdf?src-supplier=Verical, ComponentLink6URL=https://datasheet.ciiva.com/15189/getdatasheetpartid-409289-15189591.pdf?src-supplier=Verical, Construction=Rectangular, Depth=0.8mm, Features="Moisture Resistant", Height=0.45mm, Item Type=Resistor, Lead Free="Lead Free", Lead Pitch=0.3mm, Length=1.6mm, Manufacturer Part Number=RC0603FR-0710KL, Military Standard=Not, Number of Pins=2, Number of Terminations=2, Packaging="Tape and Reel", Power Rating=100mW, Pricing 1="1=0.10000, 10=0.02400, 100=0.00970, 1000=0.00436, 2500=0.00378 (USD)", REACH SVHC=Unknown, RoHS=Yes, RoHS Compliant=Yes, Series=RC, Size Code=0603, Stock 1=25249139, Supplier 1=Digi-Key, Termination=SMD/SMT, Tolerance=1%, Weight=7.1E-05oz, Width=0.8mm
R26 R27 R28 R29: library part RC0603FR-07680RL, "RES SMD 680 OHM 1% 1/10W 0603", LCSC Part Number=C112310, Manufacturer=Yageo, Package=0603, ComponentLink4Description=LCSC, ComponentLink4URL=https://www.lcsc.com/product-detail/Chip-Resistor-Surface-Mount_YAGEO-RC0603FR-07680RL_C112310.html, Item Type=Resistor, Manufacturer Part Number=RC0603FR-07680RL
R30 R31 R32 R33 R36 R37 R38 R39 R42 R43 R44 R45: library part CRCW2512200KFKEG, "RES SMD 200K OHM 1% 1W 2512", LCSC Part Number=C2078538, Manufacturer="Vishay Dale", Voltage Rating (DC)=500V, ComponentLink1Description=https://datasheet.ciiva.com/16435/dcrcwe3-16435690.pdf?src-supplier=Future+Electronics, ComponentLink1URL=https://datasheet.ciiva.com/16435/dcrcwe3-16435690.pdf?src-supplier=Future+Electronics, ComponentLink2Description=https://datasheet.ciiva.com/5545/dcrcwe3-109170-5545692.pdf?src-supplier=Mouser, ComponentLink2URL=https://datasheet.ciiva.com/5545/dcrcwe3-109170-5545692.pdf?src-supplier=Mouser, Item Type=Resistors, Lead Free=5697LeadFree, Manufacturer Part Number=CRCW2512200KFKEG, Pricing="1=0.3, 10=0.127, 50=0.127, 100=0.082, 1000=0.067, 10000=0.047 (USD)", RoHS=Yes, Stock=29311, Supplier=Mouser
R34 R35 R40 R41 R46 R47 R74: library part RC2512JK-071KL, "RES 1K OHM 5% 1W 2512", Case Code (Imperial)=2512, Case Code (Metric)=6432, LCSC Part Number=C137010, Manufacturer=Yageo, Max Operating Temperature=155°C, Max Power Dissipation=1W, Min Operating Temperature=-55°C, Resistance Tolerance=5%, Resistor Type="Thick Film", Supplier Part Number=9067984, Temperature Coefficient=100ppm/°C, Voltage Rating=200V, Case/Package=2512, Category="Chip SMD Resistors", ComponentLink1Description=https://datasheet.ciiva.com/5595/pyu-rc2512-51-rohs-l-4-5595927.pdf?src-supplier=Mouser, ComponentLink1URL=https://datasheet.ciiva.com/5595/pyu-rc2512-51-rohs-l-4-5595927.pdf?src-supplier=Mouser, ComponentLink2Description=https://datasheet.ciiva.com/7672/638316-7672039.pdf?src-supplier=Element14, ComponentLink2URL=https://datasheet.ciiva.com/7672/638316-7672039.pdf?src-supplier=Element14, ComponentLink3Description=https://datasheet.ciiva.com/7672/638316-7672038.pdf?src-supplier=Element14, ComponentLink3URL=https://datasheet.ciiva.com/7672/638316-7672038.pdf?src-supplier=Element14, Contact Plating=Tin,Lead, Features="Moisture Resistant", Height=0.026inch, Item Type=Resistor, Lead Free=5697LeadFree, Length=0.25inch, Manufacturer Part Number=RC2512JK-071KL, Number of Terminations=2, Packaging="Tape and Reel", Power Rating=1W, Pricing="4000=0.0216, 16000=0.0207, 40000=0.0201, 100000=0.0195, 160000=0.0187 (USD)", Reach SVHC Compliant=Unknown, RoHS=Yes, RoHS Compliant=Yes, Series=RC, Stock=596000, Supplier="Future Electronics", Technology="THICK FILM", Termination=SMD/SMT, Tolerance=5%, Width=3.1mm, Working Voltage=200V
R48 R49 R50 R51 R52 R53 R54 R55 R56 R57 R58 R59 R60 R61 R62 R63 R64 R91 R92 R95 R152 R166 R167 R168 R169: library part RC0402FR-070RL, "RES 0 OHM JUMPER 1/16W 0402", Case Code (Imperial)=0402, Case Code (Metric)=1005, LCSC Part Number=C106231, Manufacturer=Yageo, Max Operating Temperature=155°C, Max Power Dissipation=63mW, Min Operating Temperature=-55°C, Power Rating=62.5mW, Resistor Type="Thick Film", Supplier Part Number 1=603-RC0402FR-070RL, Temperature Coefficient=200ppm/°C, Tolerance=1%, Voltage Rating=50V, Case/Package=0402, ComponentLink1Description=https://datasheet.ciiva.com/8896/pyu-rc0402-51-rohs-l-6-8896149.pdf?src-supplier=Avnet, ComponentLink1URL=https://datasheet.ciiva.com/8896/pyu-rc0402-51-rohs-l-6-8896149.pdf?src-supplier=Avnet, ComponentLink2Description=https://datasheet.ciiva.com/16790/pyu-rc0402-51-rohs-l-6-r-16790444.pdf?src-supplier=Future+Electronics, ComponentLink2URL=https://datasheet.ciiva.com/16790/pyu-rc0402-51-rohs-l-6-r-16790444.pdf?src-supplier=Future+Electronics, Contact Plating=Tin,Matte, Features="Moisture Resistant", Height=0.35mm, Item Type=Resistors, Lead Free="Lead Free", Length=1mm, Manufacturer Part Number=RC0402FR-070RL, Mount="Surface Mount", Number of Terminations=2, Packaging="Tape and Reel", Pricing 1="1=0.10000, 10=0.01400, 50=0.01400, 100=0.00600, 1000=0.00300, 5000=0.00200, 10000=0.00100 (USD)", Radiation Hardening=No, Resistance=0R, RoHS=Yes, RoHS Compliant=Yes, Series=RC, Size Code=0402, Stock 1=8556842, Supplier 1=Mouser, Termination=SMD/SMT, Width=0.5mm
R67 R76 R77 R78 R79 R80 R81 R82 R83 R89 R90 R157 R175: library part RC0402FR-0710KL, "RES 10K OHM 1% 1/16W 0402", Case Code (Imperial)=0402, Case Code (Metric)=1005, LCSC Part Number=C60490, Manufacturer=Yageo, Max Operating Temperature=155°C, Max Power Dissipation=63mW, Min Operating Temperature=-55°C, Power Rating=62.5mW, Resistance=10kR, Resistance Tolerance=1%, Resistor Type="Thick Film", Supplier Part Number 1=603-RC0402FR-0710KL, Temperature Coefficient=100ppm/°C, Voltage Rating=50V, Case/Package=0402, Category="Chip SMD Resistors", ComponentLink1Description=https://datasheet.ciiva.com/7660/38568-7660787.pdf?src-supplier=Element14, ComponentLink1URL=https://datasheet.ciiva.com/7660/38568-7660787.pdf?src-supplier=Element14, ComponentLink2Description=https://datasheet.ciiva.com/7849/1686128-7849814.pdf?src-supplier=Element14, ComponentLink2URL=https://datasheet.ciiva.com/7849/1686128-7849814.pdf?src-supplier=Element14, ComponentLink3Description=https://datasheet.ciiva.com/7983/1018594-7983486.pdf?src-supplier=Element14, ComponentLink3URL=https://datasheet.ciiva.com/7983/1018594-7983486.pdf?src-supplier=Element14, ComponentLink4Description=https://datasheet.ciiva.com/22747/1018594-22747512.pdf?src-supplier=Element14, ComponentLink4URL=https://datasheet.ciiva.com/22747/1018594-22747512.pdf?src-supplier=Element14, ComponentLink5Description=https://datasheet.ciiva.com/12667/pyu-rc0402-51-rohs-l-6-r-12667067.pdf?src-supplier=Mouser, ComponentLink5URL=https://datasheet.ciiva.com/12667/pyu-rc0402-51-rohs-l-6-r-12667067.pdf?src-supplier=Mouser, ComponentLink6Description=https://datasheet.ciiva.com/7849/1784430-7849813.pdf?src-supplier=Element14, ComponentLink6URL=https://datasheet.ciiva.com/7849/1784430-7849813.pdf?src-supplier=Element14, ComponentLink7Description=https://datasheet.ciiva.com/7849/1784430-7849815.pdf?src-supplier=Element14, ComponentLink7URL=https://datasheet.ciiva.com/7849/1784430-7849815.pdf?src-supplier=Element14, Construction=Rectangular, Depth=0.5mm, Features="Moisture Resistant", Height=0.32mm, Item Type=Resistor, Lead Free="Lead Free", Lead Pitch=0.2mm, Length=1mm, Manufacturer Part Number=RC0402FR-0710KL, Military Standard=Not, Number of Pins=2, Number of Terminations=2, Packaging="Tape and Reel", Pricing 1="1=0.10000, 10=0.01400, 50=0.01400, 100=0.00500, 1000=0.00300, 10000=0.00200 (USD)", REACH SVHC="No SVHC", RoHS=Yes, RoHS Compliant=Yes, Series=RC, Stock 1=18648329, Supplier 1=Mouser, Termination=SMD/SMT, Tolerance=1%, Voltage Rating (DC)=50V, Width=0.5mm, Working Voltage=50V